# Altium PCB QSTL_THS3491_RGT_G20_RevD.PcbDoc
Units mil, origin at the board's own origin, x right, y up, seen from the top; angles counter-clockwise.
Board outline 1640 x 2700 mil, 4 copper layers (L1 Signal GND, L2 GND, L3 Split Power, L4 GND Thermal), stack 62.449 mil thick; 31 components, 15 nets, 83 pads, 839 vias.
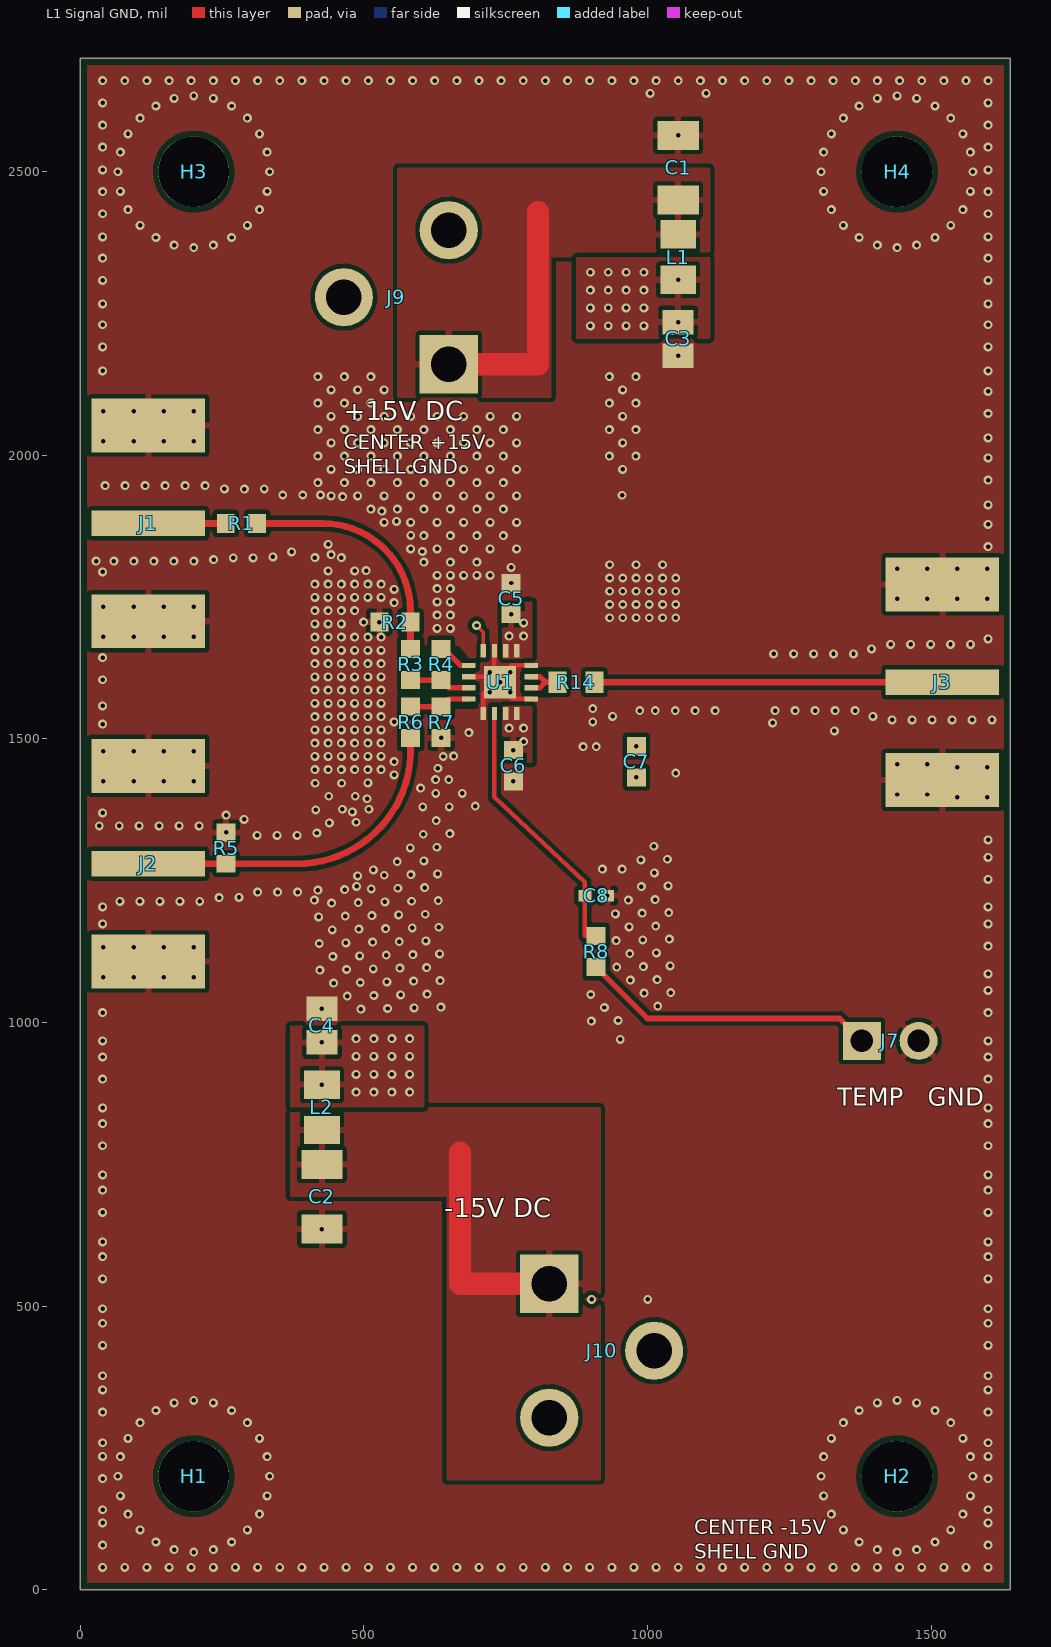
[diagram p0: L1 Signal GND view]
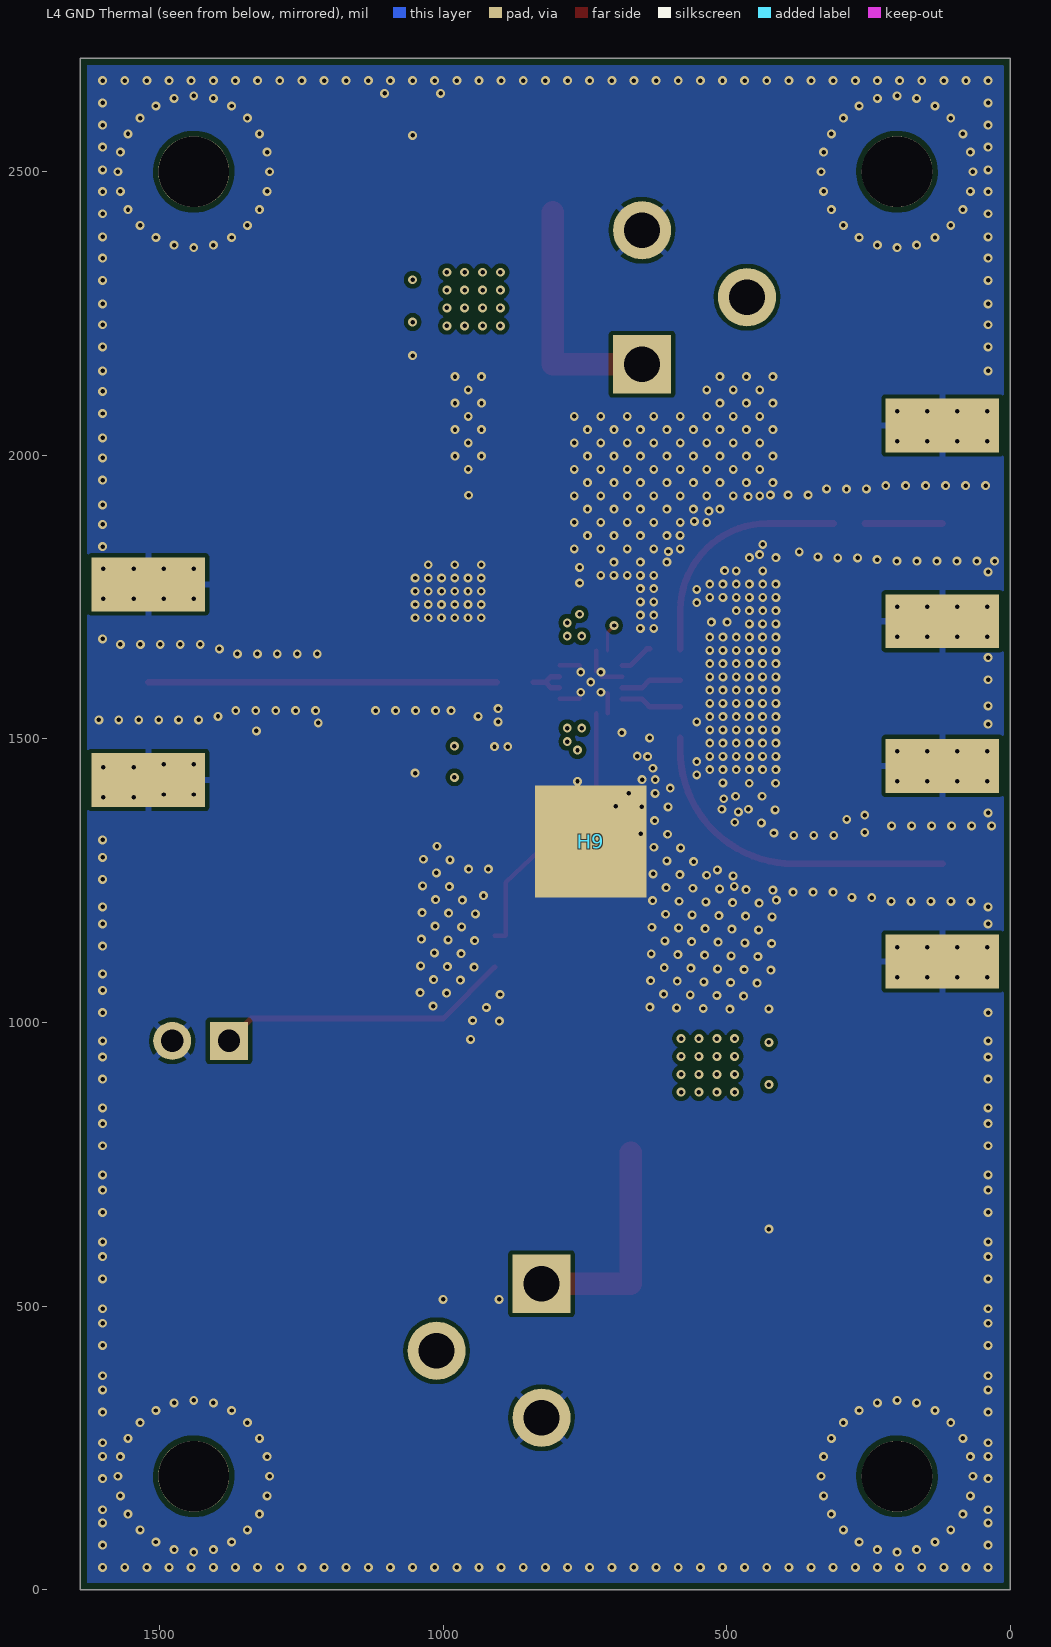
[diagram p1: L4 GND Thermal view, seen from below]
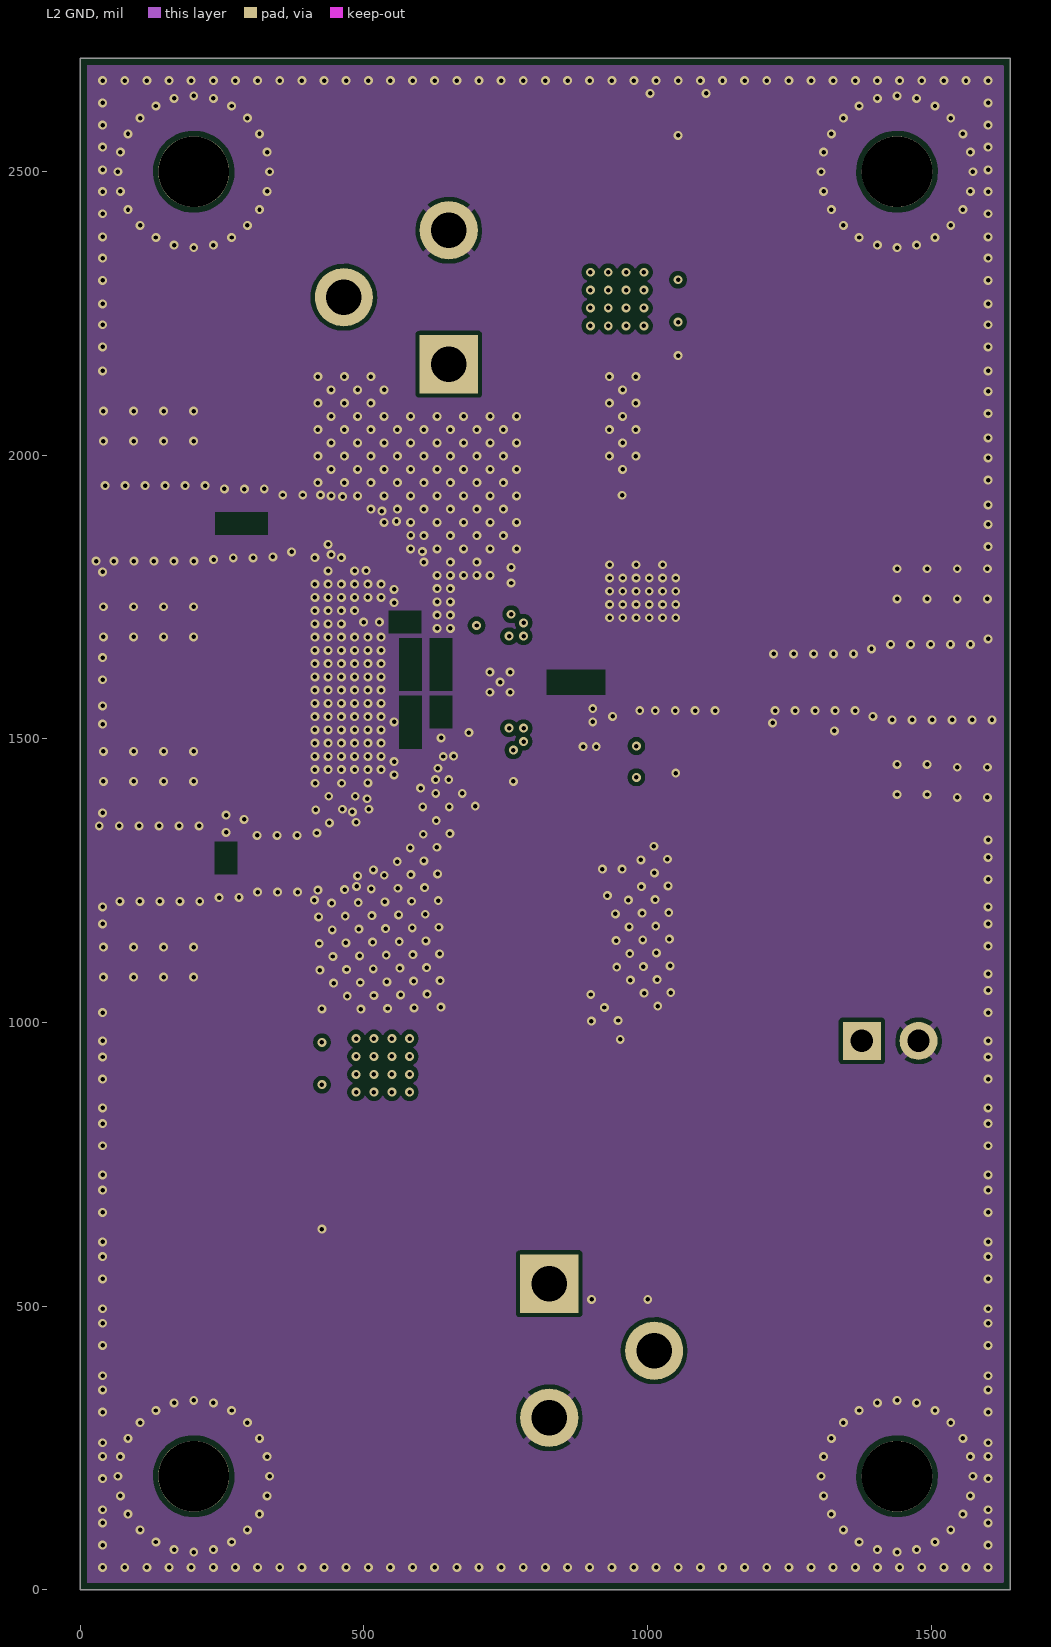
[diagram p2: L2 GND]
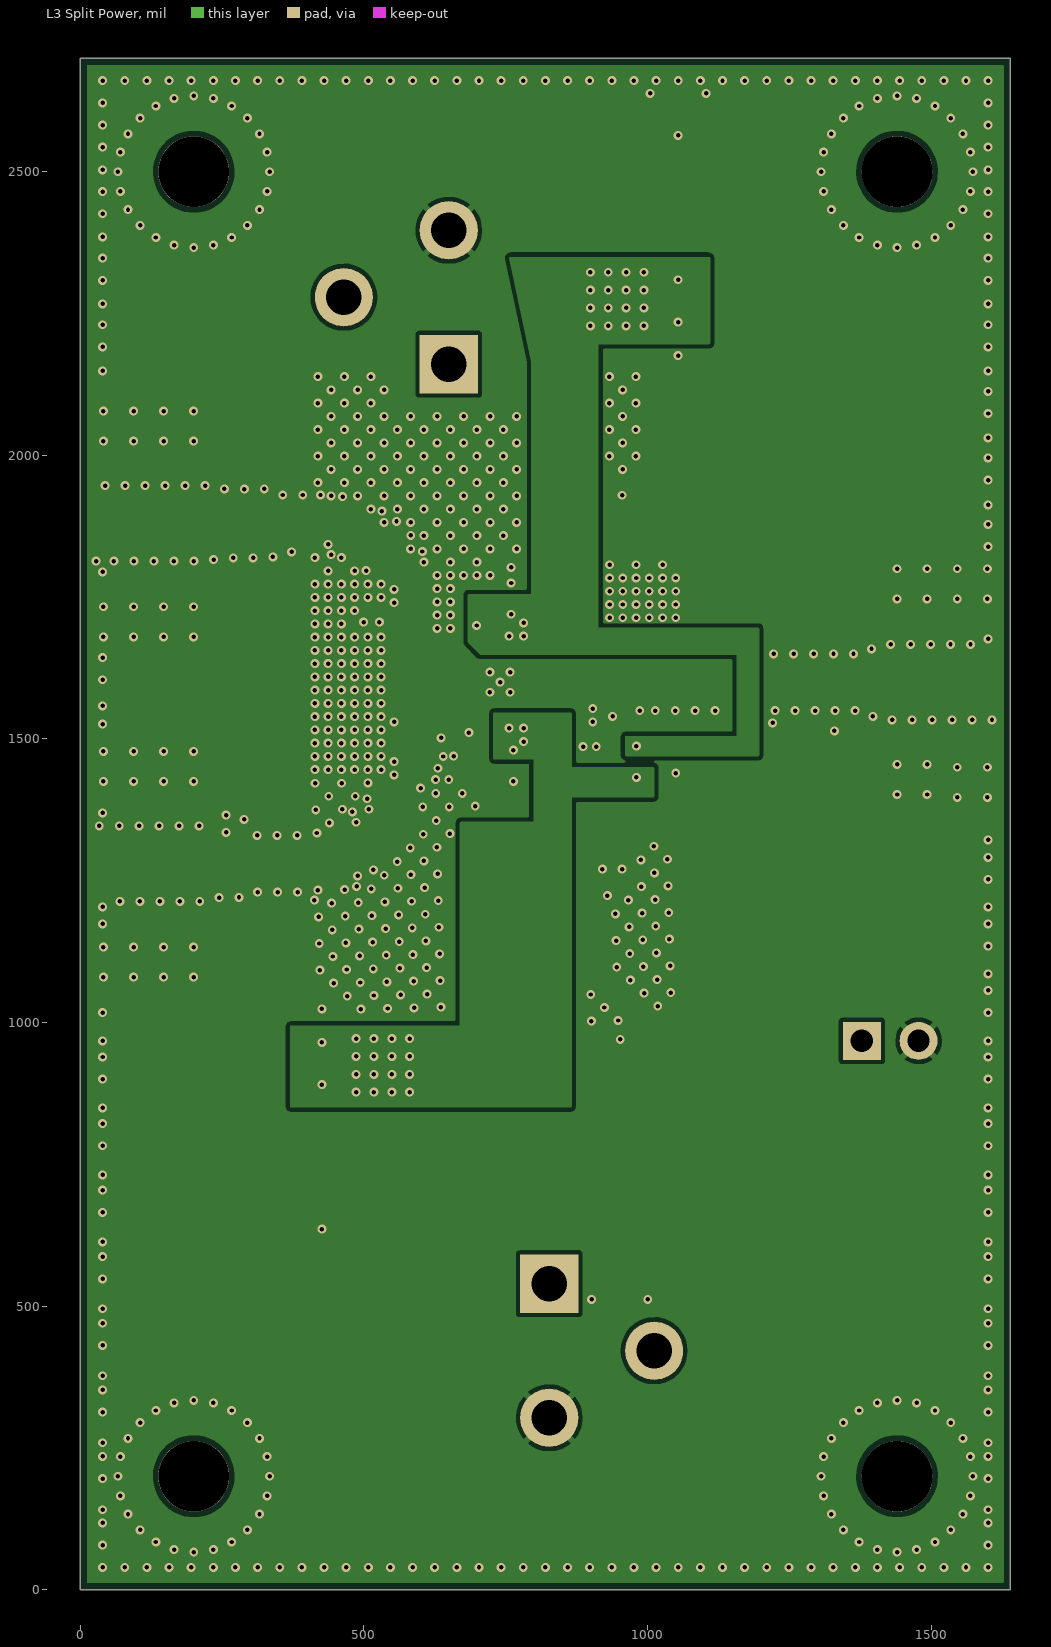
[diagram p3: L3 Split Power]
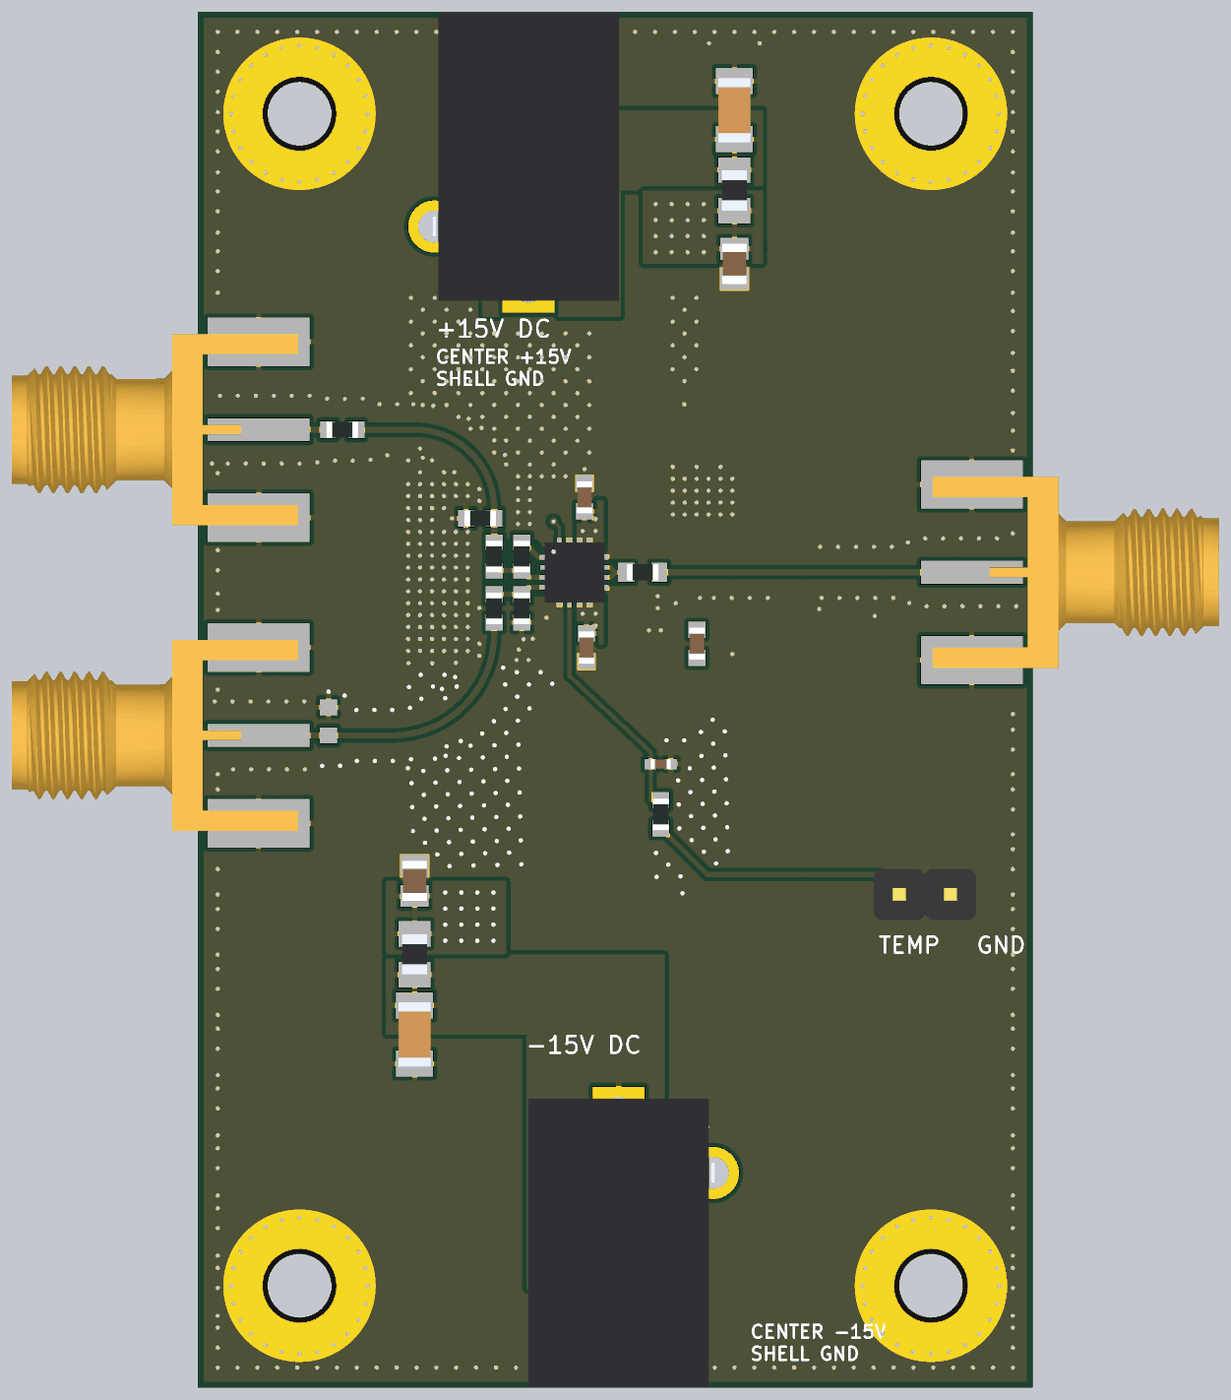
[diagram p4: 3D render of the assembled board from above, using the file's embedded part models]

## Layer stack, top to bottom
Top Solder: solder mask 0.5984, Solder Resist, Dk 3.8
L1 Signal GND: signal copper 1.378
7628 Prepreg: dielectric 8.2835, FR4-7628, Dk 4.4
L2 GND: signal copper 0.5984
FR4 Core: core 41.9291, FR4, Dk 4.6
L3 Split Power: signal copper 0.5984
7628 Prepreg: dielectric 8.2835, FR4-7628, Dk 4.4
L4 GND Thermal: signal copper 1.378
Bottom Solder: solder mask 0.5984, Solder Resist, Dk 3.8

## Board outline
0,2700 1640,2700 1640,0 0,0

## Design rules (kind name [scope] priority, off if disabled: settings)
Clearance Copper_to_polygon_0p20 [InPolygon] p1: gap=7.87 ignorepadtopadclearanceinfootprint=FALSE
Clearance Copper_min_0p15 [All] p2: gap=5.91 ignorepadtopadclearanceinfootprint=FALSE
HoleSize Finished_drill [All] p1: absolutevalues=TRUE maxlimit=125.98 minlimit=7.87 maxpercent=80.000 minpercent=20.000
MinimumAnnularRing Annular_ring [All] p1: minimumring=5.91
PolygonConnect Direct_RF_thermal_vias [IsVia Or InComponent('U1') Or InComponent('H9') Or ((InComponent('C3') Or InComponent('C4') Or InComponent('C5') Or InComponent('C6')) And InNet('GND'))] p1: connectstyle=Direct reliefconductorwidth=10 reliefentries=4 polygonreliefangle="90 Angle" airgapwidth=9.02
PolygonConnect Pad_thermal_relief [Not (IsVia Or InComponent('U1') Or InComponent('H9') Or ((InComponent('C3') Or InComponent('C4') Or InComponent('C5') Or InComponent('C6')) And InNet('GND')))] p2: connectstyle=Relief reliefconductorwidth=9.84 reliefentries=4 polygonreliefangle="90 Angle" airgapwidth=7.87
RoutingVias [All] p1: holewidth=28 width=50 viastyle="Through Hole" minholewidth=28 minwidth=50 maxholewidth=28 maxwidth=50
SolderMaskExpansion Mask_expansion [All] p1: expansion=1.57 istentingtop=FALSE
Width Trace_width [All] p1: maxlimit=59.06 minlimit=5.91 preferedwidth=12.04
29 further rules are at their usual default settings.

## Components (designator, comment, footprint, x,y, rotation, side; value= is the part's Value field where it differs from the comment)
C1 "Comment" 1206 1054,2507.09 r90 top
C2 "Comment" 1206 426,692.91 r270 top
C3 "Comment" 0805L 1054,2205.46 r270 top
C4 "Comment" 0805L 426,994.54 r90 top
C5 "Comment" 0603L 759.69,1747.37 r90 top
C6 "Comment" 0603L 763.42,1452.63 r270 top
C7 "Comment" 0603L 980.32,1459.84 r270 top
C8 "Comment" 0402L 909.45,1223.62 r0 top
H1 "Comment" B_F_PMSSS4400025PH 200,200 r0 top
H2 "Comment" B_F_PMSSS4400025PH 1440,200 r0 top
H3 "Comment" B_F_PMSSS4400025PH 200,2500 r0 top
H4 "Comment" B_F_PMSSS4400025PH 1440,2500 r0 top
H9 "Comment" Aavid_7109DG 740,1319.13 r180 bottom
J1 "Comment" Emerson_142-0701-851 10,1880 r90 top
J2 "Comment" Emerson_142-0701-851 10,1280 r90 top
J3 "Comment" Emerson_142-0701-851 1630,1600 r270 top
J7 "Comment" PinHeader_1x02_P2.54mm_Vertical 1377.95,967.72 r90 top
J9 "Comment" SameSky_PJ-102AH 649.61,2160.63 r180 top
J10 "Comment" SameSky_PJ-102AH 826.77,539.37 r0 top
L1 "Comment" 0805_HV 1054,2349.61 r270 top
L2 "Comment" 0805_HV 426,850.39 r90 top
R1 "Comment" 0603L 284,1880 r0 top
R2 "Comment" 0603L 554.75,1706 r0 top
R3 "Comment" 0603L 582.31,1631.24 r270 top
R4 "Comment" 0603L 636.31,1631.24 r90 top
R5 "Comment" 0603L 257,1307.56 r270 top
R6 "Comment" 0603L 582.31,1529.39 r90 top
R7 "Comment" 0603L 636.31,1529.39 r90 top
R8 "Comment" 0603L 909.45,1125.2 r90 top
R14 "Comment" R_0603_1608Metric 874.02,1600 r0 top
U1 "Comment" RGT0016A 740,1600 r0 top

## Footprints (in the part's own frame and the unit in brackets; to place one, negate y for a bottom-side part, rotate by r counter-clockwise, add the part's x,y. Pads: shape width x height; smd on the part's side, far side on the other; paste and mask are expansions set on the pad)
0402L [mm]
  rect 0.6x0.5 smd paste+0 mask+0.04: 1(-0.5,0) 2(0.5,0)
  body extent -0.5,-0.25 0.5,0.25, height 0.5
0603L [mm]
  rect 0.8x0.85 smd paste+0 mask+0.04: 1(-0.7,0) 2(0.7,0)
  body extent -0.8,-0.4 0.8,0.4, height 0.8
0805_HV [mil]
  rect 50x63 smd paste+0 mask+1.57: 1(-40,0) 2(40,0)
  body extent -39,-25 39,25, height 33
0805L [mm]
  rect 1.1x1.4 smd paste+0 mask+0.04: 1(-0.75,0) 2(0.75,0)
  body extent -1,-0.63 1,0.63, height 1.25
1206 [mm]
  rect 1.3x1.85 smd paste+0 mask+0.04: 1(-1.45,0) 2(1.45,0)
  body extent -1.6,-0.8 1.6,0.8, height 0.85
Aavid_7109DG [mm]
  rect 5x5 smd paste+0 mask+0.04: 1(0,0)
  body extent -12.7,-2.56 12.7,16.82, height 11.43
B_F_PMSSS4400025PH [mil]
  round 125 hole 125 unplated paste-99999 mask+87.11: ""(0,0)
Emerson_142-0701-851 [mil]
  rect 45x200 smd paste+0 mask+1.57: 1(0,-110)
  rect 95x200 smd paste+0 mask+1.57: 2(-172.5,-110) 3(172.5,-110)
  rect 95x200 smd far side paste+0 mask+1.57: 4(172.5,-110) 5(-172.5,-110)
  body extent -188,-187 188,375, height 161
PinHeader_1x02_P2.54mm_Vertical [mm]
  rect 1.7x1.7 hole 1 paste-2539.97 mask+0.04: 1(0,0)
  round 1.7 hole 1 paste-2539.97 mask+0.04: 2(0,-2.54)
  body extent -1.27,-3.81 1.27,1.27, height 8.54
R_0603_1608Metric [mm]
  rect 0.8x0.95 smd paste+0 mask+0.04: 1(-0.825,0) 2(0.825,0)
  body extent -0.8,-0.4 0.8,0.4, height 0.45
RGT0016A [mm]
  rect 0.6x0.24 smd paste+0 mask+0.04: 1(-1.4,0.75) 2(-1.4,0.25) 3(-1.4,-0.25) 4(-1.4,-0.75) 9(1.4,-0.75) 10(1.4,-0.25) 11(1.4,0.25) 12(1.4,0.75)
  rect 0.24x0.6 smd paste+0 mask+0.04: 5(-0.75,-1.4) 6(-0.25,-1.4) 7(0.25,-1.4) 8(0.75,-1.4) 13(0.75,1.4) 14(0.25,1.4) 15(-0.25,1.4) 16(-0.75,1.4)
  rect 1.45x1.45 smd paste+0 mask+0.04: 17(0,0)
  body extent -1.5,-1.5 1.5,1.5, height 1.01
SameSky_PJ-102AH [mm]
  rect 2.6x2.6 hole 1.6 paste-2539.97 mask+0.04: 1(0,0)
  round 2.6 hole 1.6 paste-2539.97 mask+0.04: 2(0,-6) 3(4.7,-3)
  body extent -4.5,-13.7 4.8,0.7, height 11

## Part data
C1 C2: library part GRM319R61H475KA12D, "4.7u / 50V"
C3 C4: library part C2012X5R1H105KT000N, "1u / 50V"
C5 C6: library part CL10B104KB8NNNC, "100n / 50V X7R"
C7: library part 06031C103KAT2A, "10n / 100V"
C8: library part GRM155R61E104KA87D, "100n / 25V"
H1 H2 H3 H4: library part "PMSSS 440 0025 PH", "PMSSS 440 0025 PH"
H9: library part 7109DG, "7109DG"
J1: library part 142-0701-851, "SMA IN-"
J2: library part 142-0701-851, "SMA IN+"
J3: library part 142-0701-851, "SMA OUT"
J7: library part GENERIC_1x02_2.54mm, "TEMP / GND"
J9: library part PJ-102AH, "+15V DC"
J10: library part PJ-102AH, "-15V DC"
L1 L2: library part BLM21PG221SN1D, "220R @100MHz"
R1 R7 R14: library part CRCW060349R9FKEA, "49.9"
R2 R6 R8: library part CRCW06030000Z0EA, "0"
R3: library part RC0603FR-0720R5L, "20.5"
R4: library part CRCW0603390RFKEAHP, "390"
R5: library part CRCW060349R9FKEA, "49.9 DNP"
U1: library part THS3491IRGTR, "THS3491IRGTR"

## Via types
v1: diameter 15.75, hole 7.87, L1 Signal GND to L4 GND Thermal, tented both sides, 839 vias

## Nets (pads, with @x,y where several pads share a name; then routed paths per layer and width w, separated by ;. In a path a pad name is that pad's centre, name@x,y a point inside that pad or via, vN(x,y) a via of type N, cw(c..) or ccw(c..) an arc to the next point about the centre after c; other vN are vias at no path point)
AMP_OUT: R14.1 U1.10 U1.11 | length 101
  L1 Signal GND w9.45: U1.10 810.09,1590.16 819.93,1600 ; U1.11 810.09,1609.84 819.93,1600 ; 819.93,1600 R14.1 819.93,1600
FB: R4.2 U1.1 | length 60.7
  L1 Signal GND w9.45: R4.2 641,1658.8 670.27,1629.53 U1.1
GND: C1.2 C2.2 C3.2 C4.2 C5.2 C6.2 C8.2 H9.1 J1.2 J1.3 J1.4 J1.5 J2.2 J2.3 J2.4 J2.5 J3.2 J3.3 J3.4 J3.5 J7.2 J9.2 J10.2 R2.1 R5.1 R7.1 U1.2 U1.5 U1.9 U1.12 U1.15 U1.17 | length 177.2
  L1 Signal GND w7.87: U1.2 U1.17@720.32,1609.84 ; U1.5 710.47,1580.32 ; U1.17@730.16,1619.68 U1.15 ; 759.69,1570.47 U1.9 ; 759.69,1629.53 U1.12
  other v1: 39.37,39.37 78.4,39.37 117.43,39.37 156.46,39.37 195.5,39.37 234.53,39.37 273.56,39.37 312.59,39.37 351.62,39.37 390.65,39.37 429.69,39.37 468.72,39.37 507.75,39.37 546.78,39.37 585.81,39.37 624.84,39.37 663.87,39.37 702.91,39.37 741.94,39.37 780.97,39.37 820,39.37 859.03,39.37 898.06,39.37 937.09,39.37 976.13,39.37 1015.16,39.37 1054.19,39.37 1093.22,39.37 1132.25,39.37 1171.28,39.37 1210.32,39.37 1249.35,39.37 1288.38,39.37 1327.41,39.37 1366.44,39.37 1405.47,39.37 1444.5,39.37 1483.54,39.37 1522.57,39.37 1561.6,39.37 1600.63,39.37 200,66.14 1440,66.14 165.36,70.7 234.65,70.7 1405.36,70.7 1474.65,70.7 39.37,78.49 1600.63,78.49 133.07,84.08 266.93,84.08 1373.07,84.08 1506.93,84.08 105.35,105.35 294.65,105.35 1345.35,105.35 1534.65,105.35 39.37,117.62 1600.63,117.62 84.08,133.07 315.93,133.07 1324.08,133.07 1555.92,133.07 39.37,140.94 1600.63,140.94 70.7,165.35 329.3,165.35 1310.7,165.35 1569.3,165.35 39.37,195.86 1600.63,195.86 66.14,200 333.86,200 1306.14,200 1573.86,200 39.37,234.99 70.7,234.65 329.3,234.65 1310.7,234.65 1569.3,234.65 1600.63,234.99 39.37,259.06 1600.63,259.06 84.08,266.93 315.93,266.93 1324.08,266.93 1555.92,266.93 105.35,294.65 294.65,294.65 1345.35,294.65 1534.65,294.65 39.37,313.23 1600.63,313.23 133.07,315.92 266.93,315.92 1373.07,315.92 1506.93,315.92 165.36,329.3 234.65,329.3 1405.36,329.3 1474.65,329.3 200,333.86 1440,333.86 39.37,352.36 1600.63,352.36 39.37,377.17 1600.63,377.17 39.37,430.6 1600.63,430.6 39.37,469.73 1600.63,469.73 39.37,495.28 1600.63,495.28 901.58,511.83 1000.42,511.83 39.37,547.97 1600.63,547.97 39.37,587.1 1600.63,587.1 39.37,613.39 1600.63,613.39 426,635.83 39.37,665.34 1600.63,665.34 39.37,704.47 1600.63,704.47 39.37,731.5 1600.63,731.5 39.37,782.71 1600.63,782.71 39.37,821.84 1600.63,821.84 39.37,849.61 1600.63,849.61 39.37,900.08 1600.63,900.08 39.37,939.21 1600.63,939.21 39.37,967.72 1600.63,967.72 952,970.3 901.16,1002.41 948.16,1003.56 39.37,1017.45 1600.63,1017.45 426,1024.07 494.69,1023.52 541.69,1024.68 588.69,1025.84 924.08,1026.48 635.69,1026.99 1018.08,1028.8 470.62,1046.45 517.62,1047.6 564.61,1048.76 900.01,1049.41 611.61,1049.91 994,1051.72 1041,1052.87 1600.63,1056.58 446.54,1069.37 493.54,1070.52 540.54,1071.68 587.53,1072.83 634.53,1073.99 969.93,1074.64 1016.92,1075.79 40.81,1080 93.81,1080 146.81,1080 199.81,1080 1600.63,1085.83 422.46,1092.29 469.46,1093.44 516.46,1094.6 563.46,1095.75 610.45,1096.91 945.85,1097.56 992.85,1098.72 1039.84,1099.87 445.39,1116.36 492.38,1117.52 539.38,1118.68 586.38,1119.83 633.38,1120.99 968.77,1121.64 1015.77,1122.79 40.81,1133 93.81,1133 146.81,1133 199.81,1133 1600.63,1134.82 421.31,1139.28 468.31,1140.44 515.3,1141.6 562.3,1142.75 609.3,1143.91 944.69,1144.56 991.69,1145.71 1038.69,1146.87 444.23,1163.36 491.23,1164.52 538.22,1165.67 585.22,1166.83 632.22,1167.98 967.61,1168.63 1014.61,1169.79 39.37,1173.95 1600.63,1173.95 420.15,1186.28 467.15,1187.44 514.15,1188.59 561.15,1189.75 608.14,1190.91 943.54,1191.55 990.53,1192.71 1037.53,1193.87 39.37,1203.94 1600.63,1203.94 443.07,1210.36 490.07,1211.51 69.73,1213.43 104.95,1213.43 140.17,1213.43 175.39,1213.43 210.62,1213.43 537.07,1212.67 584.07,1213.83 631.06,1214.98 412.79,1215.8 966.46,1215.63 1013.46,1216.79 244.56,1220.18 279.77,1220.6 929.13,1223.62 312.78,1229.91 348,1229.91 383.22,1229.91 419,1233.28 465.99,1234.44 512.99,1235.59 559.99,1236.75 606.99,1237.9 486.99,1239.9 989.38,1239.71 1036.38,1240.86 1600.63,1252.19 488.92,1258.51 535.91,1259.67 582.91,1260.82 629.91,1261.98 1012.3,1263.78 516.63,1269.05 920.61,1270.33 955.27,1270.33 558.83,1283.74 605.83,1284.9 988.22,1286.71 1035.22,1287.86 1600.63,1291.32 581.75,1307.82 628.75,1308.98 1011.14,1310.78 1600.63,1322.05 311.65,1330.09 346.88,1330.09 382.1,1330.09 604.68,1331.9 651.67,1333.05 417,1334.16 257,1335.12 33.38,1346.57 68.6,1346.57 103.83,1346.57 139.05,1346.57 174.27,1346.57 209.49,1346.57 439.16,1351.93 486.15,1353.08 627.6,1355.97 288.65,1358.24 257,1365.83 39.37,1369.56 479.73,1371.23 415.08,1374.85 462.08,1376 508.8,1376 603.8,1380.05 650.52,1380.05 696.36,1381.49 505.56,1394.57 1546.19,1397 1599.19,1397 438,1398.92 484.72,1398.92 1440.19,1402 1493.19,1402 626.72,1404.13 673.44,1404.13 599.85,1413.13 413.92,1421.84 460.64,1421.84 506.92,1422.56 40.81,1425 93.81,1425 146.81,1425 199.81,1425 763.42,1425.07 626.28,1428.2 649.64,1428.2 553.13,1436.48 1049.87,1439.64 413.48,1445.92 436.84,1445.92 460.2,1445.92 483.56,1445.92 506.92,1445.92 530.28,1445.92 630.5,1448.24 1546.19,1450 1599.19,1450 1440.19,1455 1493.19,1455 553.13,1459.84 413.48,1469.28 436.84,1469.28 460.2,1469.28 483.56,1469.28 506.92,1469.28 530.28,1469.28 639.85,1468.99 658.01,1469.63 40.81,1478 93.81,1478 146.81,1478 199.81,1478 886.36,1486.36 909.72,1486.36 413.48,1492.64 436.84,1492.64 460.2,1492.64 483.56,1492.64 506.92,1492.64 530.28,1492.64 636.31,1501.83 685.11,1510.97 1329.54,1514.17 413.48,1516 436.84,1516 460.2,1516 483.56,1516 506.92,1516 530.28,1516 39.37,1526.05 1220.47,1528.15 553.13,1529.92 903.51,1529.92 1431.3,1533.43 1466.52,1533.43 1501.75,1533.43 1536.97,1533.43 1572.19,1533.43 1607.41,1533.43 413.48,1539.36 436.84,1539.36 460.2,1539.36 483.56,1539.36 506.92,1539.36 530.28,1539.36 938.67,1539.66 1397.24,1539.76 986.33,1549.91 1013.68,1549.91 1048.91,1549.91 1084.13,1549.91 1119.35,1549.91 1225.02,1549.91 1260.24,1549.91 1295.46,1549.91 1330.68,1549.91 1365.91,1549.91 903.51,1553.28 39.37,1558.27 413.48,1562.72 436.84,1562.72 460.2,1562.72 483.56,1562.72 506.92,1562.72 530.28,1562.72 722.28,1582.28 757.72,1582.28 413.48,1586.08 436.84,1586.08 460.2,1586.08 483.56,1586.08 506.92,1586.08 530.28,1586.08 740,1600 39.37,1604.3 413.48,1609.43 436.84,1609.43 460.2,1609.44 483.56,1609.44 506.92,1609.44 530.28,1609.44 722.28,1617.72 757.72,1617.72 413.48,1632.79 436.84,1632.79 460.2,1632.79 483.56,1632.8 506.92,1632.8 530.28,1632.8 39.37,1643.42 1222.3,1650.09 1257.53,1650.09 1292.75,1650.09 1327.97,1650.09 1363.19,1650.09 413.48,1656.15 436.84,1656.15 460.2,1656.15 483.56,1656.15 506.92,1656.15 530.28,1656.15 1394.96,1658.76 1428.59,1666.57 1463.81,1666.57 1499.04,1666.57 1534.26,1666.57 1569.48,1666.57 1600.63,1676.38 40.81,1680 93.81,1680 146.81,1680 199.81,1680 413.48,1679.51 436.84,1679.51 460.2,1679.51 483.56,1679.51 506.92,1679.51 530.28,1679.51 629,1695 652.36,1695 413.48,1702.87 436.84,1702.87 460.2,1702.87 499.63,1706 527.19,1706 933.08,1713.64 956.44,1713.64 979.8,1713.64 1003.16,1713.64 1026.51,1713.64 1049.87,1713.65 629,1718.36 652.36,1718.36 413.48,1726.23 436.84,1726.23 460.2,1726.23 483.56,1726.23 40.81,1733 93.81,1733 146.81,1733 199.81,1733 933.08,1737 956.44,1737 979.8,1737 1003.15,1737 1026.51,1737 1049.87,1737 553.13,1740.15 629,1741.72 652.36,1741.72 1440.19,1747 1493.19,1747 1546.19,1747 1599.19,1747 413.48,1749.59 436.84,1749.59 460.2,1749.59 483.56,1749.59 506.92,1749.59 530.28,1749.59 933.08,1760.36 956.44,1760.36 979.79,1760.36 1003.15,1760.36 1026.51,1760.36 1049.87,1760.36 553.13,1763.51 629,1765.08 652.36,1765.08 413.48,1772.95 436.84,1772.95 460.2,1772.95 483.56,1772.95 506.92,1772.95 530.28,1772.95 759.69,1774.93 933.08,1783.72 956.43,1783.72 979.79,1783.72 1003.15,1783.72 1026.51,1783.72 1049.87,1783.72 629,1788.44 652.36,1788.44 675.72,1788.44 699.08,1788.44 722.44,1788.44 39.37,1794.49 436.84,1796.31 483.56,1796.31 503.98,1796.61 1440.19,1800 1493.19,1800 1546.19,1800 1599.19,1800 759.69,1802.49 933.08,1807.08 979.79,1807.08 1026.51,1807.08 605.64,1811.8 652.36,1811.8 699.08,1811.8 27.98,1813.43 59.27,1813.43 94.49,1813.43 129.71,1813.43 164.94,1813.43 200.16,1813.43 235.07,1816.09 269.6,1819.2 304.53,1819.2 413.48,1819.67 460.2,1819.67 339.59,1820.95 442.2,1824.87 372.39,1829.91 603.23,1830.43 582.28,1835.16 629,1835.16 675.72,1835.16 722.44,1835.16 769.16,1835.16 1600.63,1839.04 436.84,1843.03 582.62,1858.94 605.64,1858.52 652.36,1858.52 699.08,1858.52 745.8,1858.52 1600.63,1878.16 535.56,1881.88 582.28,1881.88 629,1881.88 675.72,1881.88 722.43,1881.88 769.15,1881.88 557.45,1883.51 531.87,1901.48 512.2,1905.24 558.92,1905.24 605.64,1905.24 652.35,1905.24 699.07,1905.24 745.79,1905.24 1600.63,1912.6 462.45,1927.06 442.12,1928.59 488.83,1928.59 535.56,1928.59 582.28,1928.6 629,1928.6 675.71,1928.6 722.43,1928.6 769.15,1928.6 356.96,1930.09 392.18,1930.09 423.46,1930.09 955.27,1929.67 289.12,1940.29 254.17,1940.8 324.32,1940.8 43.84,1946.57 79.06,1946.57 114.28,1946.57 149.5,1946.57 184.73,1946.57 219.95,1946.57 418.75,1951.95 465.47,1951.95 512.19,1951.95 558.91,1951.95 605.63,1951.96 652.35,1951.96 699.07,1951.96 745.79,1951.96 1600.63,1956.41 442.11,1975.31 488.83,1975.31 535.55,1975.31 582.27,1975.32 628.99,1975.32 675.71,1975.32 722.43,1975.32 769.15,1975.32 956.03,1975.32 1600.63,1995.53 418.75,1998.67 465.47,1998.67 512.19,1998.67 558.91,1998.67 605.63,1998.68 652.35,1998.68 699.07,1998.68 745.79,1998.68 932.67,1998.68 979.39,1998.68 442.11,2022.03 488.83,2022.03 535.55,2022.03 582.27,2022.04 628.99,2022.04 675.71,2022.04 722.43,2022.04 769.15,2022.04 956.03,2022.04 40.81,2025 93.81,2025 146.81,2025 199.81,2025 1600.63,2030.71 418.75,2045.39 465.47,2045.39 512.19,2045.39 558.91,2045.39 605.63,2045.4 652.35,2045.4 699.07,2045.4 745.79,2045.4 932.67,2045.4 979.39,2045.4 442.11,2068.75 488.83,2068.75 535.55,2068.75 582.27,2068.76 628.99,2068.76 675.71,2068.76 722.43,2068.76 769.15,2068.76 956.03,2068.76 1600.63,2073.78 40.81,2078 93.81,2078 146.81,2078 199.81,2078 418.75,2092.11 465.47,2092.11 512.19,2092.11 932.67,2092.12 979.39,2092.12 1600.63,2112.9 442.11,2115.47 488.83,2115.47 535.55,2115.47 956.03,2115.48 418.75,2138.83 465.47,2138.83 512.19,2138.83 932.67,2138.84 979.39,2138.84 39.37,2148.82 1600.63,2148.82 1054,2175.93 39.37,2191.15 1600.63,2191.15 39.37,2230.27 1600.63,2230.27 39.37,2266.93 1600.63,2266.93 39.37,2308.52 1600.63,2308.52 39.37,2347.64 1600.63,2347.64 200,2366.14 1440,2366.14 165.36,2370.7 234.65,2370.7 1405.36,2370.7 1474.65,2370.7 133.07,2384.08 266.93,2384.08 1373.07,2384.08 1506.93,2384.08 39.37,2385.04 1600.63,2385.04 105.35,2405.35 294.65,2405.35 1345.35,2405.35 1534.65,2405.35 39.37,2425.89 1600.63,2425.89 84.08,2433.07 315.93,2433.07 1324.08,2433.07 1555.92,2433.07 39.37,2465.01 70.7,2465.35 329.3,2465.35 1310.7,2465.35 1569.3,2465.35 1600.63,2465.01 66.14,2500 333.86,2500 1306.14,2500 1573.86,2500 39.37,2503.15 1600.63,2503.15 70.7,2534.65 329.3,2534.65 1310.7,2534.65 1569.3,2534.65 39.37,2543.26 1600.63,2543.26 1054,2564.17 84.08,2566.93 315.93,2566.93 1324.08,2566.93 1555.92,2566.93 39.37,2582.38 1600.63,2582.38 105.35,2594.65 294.65,2594.65 1345.35,2594.65 1534.65,2594.65 133.07,2615.92 266.93,2615.92 1373.07,2615.92 1506.93,2615.92 39.37,2621.26 1600.63,2621.26 165.36,2629.3 234.65,2629.3 1405.36,2629.3 1474.65,2629.3 200,2633.86 1440,2633.86 1004.58,2638.17 1103.42,2638.17 39.37,2660.63 78.4,2660.63 117.43,2660.63 156.46,2660.63 195.5,2660.63 234.53,2660.63 273.56,2660.63 312.59,2660.63 351.62,2660.63 390.65,2660.63 429.69,2660.63 468.72,2660.63 507.75,2660.63 546.78,2660.63 585.81,2660.63 624.84,2660.63 663.87,2660.63 702.91,2660.63 741.94,2660.63 780.97,2660.63 820,2660.63 859.03,2660.63 898.06,2660.63 937.09,2660.63 976.13,2660.63 1015.16,2660.63 1054.19,2660.63 1093.22,2660.63 1132.25,2660.63 1171.28,2660.63 1210.32,2660.63 1249.35,2660.63 1288.38,2660.63 1327.41,2660.63 1366.44,2660.63 1405.47,2660.63 1444.5,2660.63 1483.54,2660.63 1522.57,2660.63 1561.6,2660.63 1600.63,2660.63
inm: J1.1 R1.1 | length 136.4
  L1 Signal GND w12.04: J1.1 R1.1
inpt: R6.2 R7.2 U1.4 | length 108.2
  L1 Signal GND w9.45: R7.2 649.83,1570.47 U1.4
  L1 Signal GND w10: R6.2 R7.2
inpt_raw: J2.1 R5.2 R6.1 | length 598.3
  L1 Signal GND w12.04: J2.1 382.3,1280 ccw(c382.3,1480) 582.3,1479.59 R6.1
INV: R3.2 R4.1 U1.3 | length 108.2
  L1 Signal GND w9.45: R4.1 649.83,1590.16 U1.3
  L1 Signal GND w10: R3.2 R4.1
output: J3.1 R14.2 | length 613.5
  L1 Signal GND w12.04: R14.2 1220.47,1600 J3.1
RG_DRIVE: R1.2 R2.2 R3.1 | length 425.8
  L1 Signal GND w12.04: R1.2 427.66,1880 ; 427.31,1880 cw(c427.27,1683.16) 427.66,1880 ; R3.1 R2.2 582.31,1727.38 ccw(c427.31,1725) 427.66,1880
TEMP: J7.1 R8.1 | length 522.3
  L1 Signal GND w9.84: R8.1 1000,1007.09 1338.58,1007.09 J7.1
TJ_RAW: C8.1 R8.2 U1.6 | length 481
  L1 Signal GND w7.87: U1.6 730.16,1396.85 889.76,1247.24 C8.1 889.76,1152.76 R8.2
VCC: C3.1 C5.1 C7.1 L1.2 U1.13 U1.14 U1.16 | length 49.7
  L1 Signal GND w5.91: v1(698.82,1700) 710.47,1688.19 U1.16
  other v1: 980.32,1487.4 755.91,1681.1 781.5,1681.1 781.5,1704.72 759.69,1719.81 899.29,2228.35 930.79,2228.35 962.28,2228.35 993.78,2228.35 1054,2234.98 899.29,2259.84 930.79,2259.84 962.28,2259.84 993.78,2259.84 899.29,2291.34 930.79,2291.34 962.28,2291.34 993.78,2291.34 1054,2309.61 899.29,2322.83 930.79,2322.83 962.28,2322.83 993.78,2322.83
VEE: C4.1 C6.1 C7.2 L2.2 U1.7 U1.8
  other v1: 486.22,877.17 517.72,877.17 549.21,877.17 580.71,877.17 426,890.39 486.22,908.66 517.72,908.66 549.21,908.66 580.71,908.66 486.22,940.16 517.72,940.16 549.21,940.16 580.71,940.16 426,965.02 486.22,971.65 517.72,971.65 549.21,971.65 580.71,971.65 980.32,1432.28 763.42,1480.19 781.5,1495.28 755.91,1518.9 781.5,1518.9
VIN_N: C2.1 J10.1 L2.1 | length 389
  L1 Signal GND w39.37: 669.29,770.87 669.29,539.37 J10.1
VIN_P: C1.1 J9.1 L1.1 | length 425.2
  L1 Signal GND w39.37: J9.1 807.09,2160.63 807.09,2428.35
pads on no net: H1. H2. H3. H4. J9.3 J10.3

## Polygon pours and split planes (outlines as drawn)
GND on L1 Signal GND "GND_REFERENCE" (solid, remove dead copper, pour order 8): 11.81,2688.19 1628.19,2688.19 1628.19,11.81 11.81,11.81
VIN_N on L1 Signal GND "L1_NEGATIVE_INPUT" (solid, remove dead copper, pour order 6): 369.76,850.39 917.32,850.39 917.32,192.91 645.67,192.91 645.67,692.91 369.76,692.91
VIN_P on L1 Signal GND "L1_POSITIVE_INPUT" (solid, remove dead copper, pour order 5): 559.06,2507.09 1110.24,2507.09 1110.24,2349.61 830.71,2349.61 830.71,2101.57 559.06,2101.57
VEE on L1 Signal GND "L1_VEE_ENTRY_VIA_ISLAND" (solid, remove dead copper, pour order 1): 369.76,994.54 605.99,994.54 605.99,850.39 369.76,850.39
VCC on L1 Signal GND "L1_VCC_ENTRY_VIA_ISLAND" (solid, remove dead copper, pour order 2): 874.02,2349.61 1110.24,2349.61 1110.24,2205.46 874.02,2205.46
VCC on L1 Signal GND "L1_VCC_LOCAL_PIN_ISLAND" (solid, remove dead copper, pour order 3): 744.09,1742.13 797.24,1742.13 797.24,1641.73 744.09,1641.73
VEE on L1 Signal GND "L1_VEE_LOCAL_PIN_ISLAND" (solid, remove dead copper, pour order 4): 744.09,1558.27 797.24,1558.27 797.24,1457.87 744.09,1457.87
GND on L3 Split Power "L3_GND" (solid, remove dead copper, pour order 12): 11.81,2688.19 1628.19,2688.19 1628.19,11.81 11.81,11.81
VEE on L3 Split Power "L3_VEE" (solid, remove dead copper, pour order 11): 728.35,1546.46 866.14,1546.46 866.14,1450 1011.81,1450 1011.81,1396.85 866.14,1396.85 866.14,850.39 369.76,850.39 369.76,994.54 669.29,994.54 669.29,1353.54 799.21,1353.54 799.21,1463.78 728.35,1463.78
VCC on L3 Split Power "L3_VCC" (solid, remove dead copper, pour order 7): 755.91,2349.61 1110.24,2349.61 1110.24,2196.06 913.39,2196.06 913.39,1696.06 1196.85,1696.06 1196.85,1469.68 960.63,1469.68 960.63,1505.12 1157.48,1505.12 1157.48,1648.82 704.72,1648.82 683.07,1670.47 683.07,1755.12 795.28,1755.12 795.28,2164.57
GND on L4 GND Thermal "GND_REFERENCE" (solid, remove dead copper, pour order 9): 11.81,2688.19 1628.19,2688.19 1628.19,11.81 11.81,11.81
GND on L2 GND "GND_REFERENCE" (solid, remove dead copper, pour order 10): 11.81,2688.19 1628.19,2688.19 1628.19,11.81 11.81,11.81

## Other copper
L1 Signal GND:
  pour cut-out: 688.98,1558.27 702.76,1558.27 702.76,1553.54 688.98,1553.54
  pour cut-out: 777.56,1627.17 835.43,1627.17 835.43,1572.83 777.56,1572.83
  pour cut-out: 559.06,1664.57 667.32,1664.57 694.88,1631.1 694.88,1552.36 655.51,1552.36 655.51,1574.02 559.06,1574.02
L2 GND:
  pour cut-out: 331.24,1900.67 331.24,1859.33 236.76,1859.33 236.76,1900.67
  pour cut-out: 926.18,1622.64 926.18,1577.36 821.85,1577.36 821.85,1622.64
  pour cut-out: 601.99,1726.67 601.99,1685.33 542.94,1685.33 542.94,1726.67
  pour cut-out: 602.97,1678.48 602.97,1584 561.64,1584 561.64,1678.48
  pour cut-out: 656.97,1678.48 656.97,1584 615.64,1584 615.64,1678.48
  pour cut-out: 277.67,1319.37 277.67,1260.32 236.33,1260.32 236.33,1319.37
  pour cut-out: 602.97,1576.63 602.97,1482.15 561.64,1482.15 561.64,1576.63
  pour cut-out: 656.97,1576.63 656.97,1517.58 615.64,1517.58 615.64,1576.63

## Silkscreen, mask and mechanical layers (free items; w line width, h text height)
Top Overlay:
  text "+15V DC" at 464.57,2062.2 h33.46
  text "CENTER +15V" at 464.57,2011.02 h25.59
  text "SHELL GND" at 464.57,1967.72 h25.59
  text "TEMP   GND" at 1334.65,853.54 h31.5
  text "-15V DC" at 641.73,656.69 h33.46
  text "CENTER -15V" at 1082.68,97.64 h25.59
  text "SHELL GND" at 1082.68,54.33 h25.59
Bottom Solder:
  region: 29 vertices and 24 holes, not listed, extent 19.68,19.68 1620.32,2680.32
Mechanical 1:
  the board outline again, w1.97